# Altium PCB Pod_Islands_Panel.PcbDoc (part 10 of 10)
Units mm, origin at the board's own origin, x right, y up, seen from the top; angles counter-clockwise.
Board outline 95.7 x 83.7 mm, 6 copper layers (Top Layer, Inner1, Inner2, Inner3, Inner4, Bottom Layer), stack 0.82 mm thick; 1100 components, 940 nets, 4944 pads, 3680 vias.
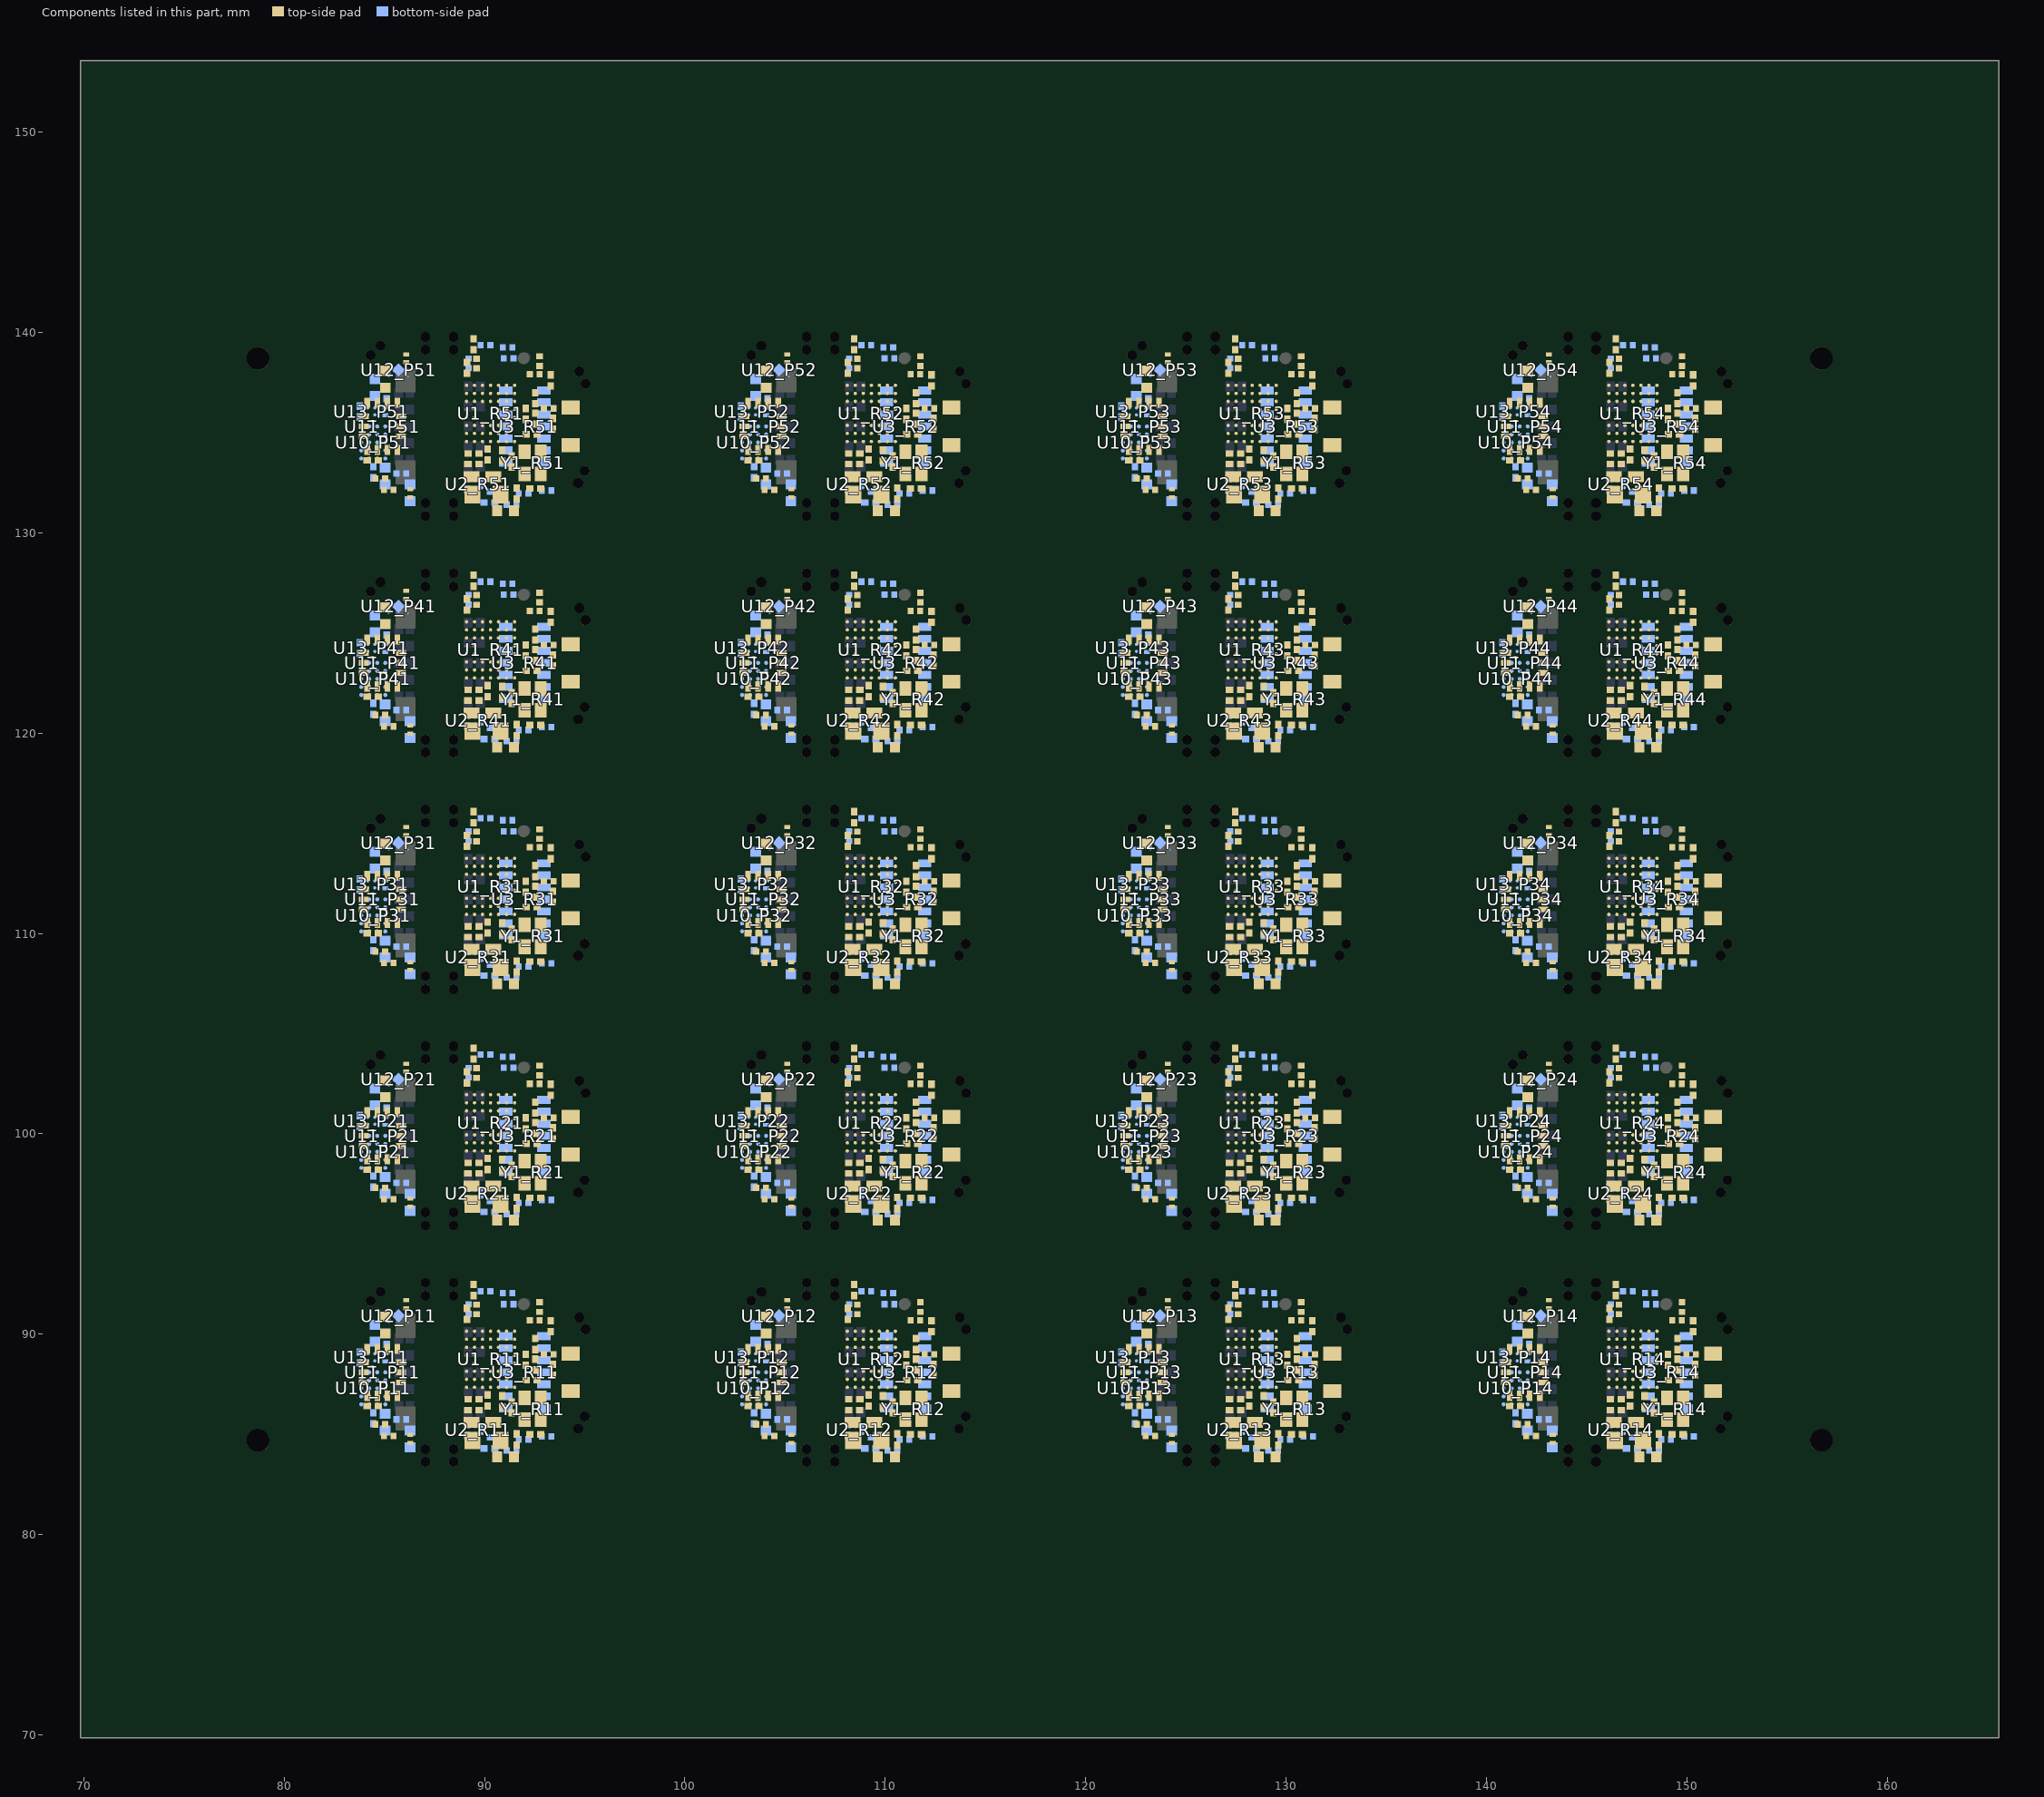
[diagram p14: the components of this part, seen from the top]

## Other copper
Top Layer:
  region: 82.2,144.7 82.196,144.635 82.183,144.571 82.162,144.509 82.133,144.45 82.097,144.396 82.054,144.346 82.004,144.303 81.95,144.267 81.891,144.238 81.829,144.217 81.765,144.204 81.7,144.2 81.635,144.204 81.571,144.217 81.509,144.238 81.45,144.267 81.396,144.303 81.346,144.346 81.303,144.396 81.267,144.45 81.238,144.509 81.217,144.571 81.204,144.635 81.2,144.7 81.204,144.765 81.217,144.829 81.238,144.891 81.267,144.95 81.303,145.004 81.346,145.054 81.396,145.097 81.45,145.133 81.509,145.162 81.571,145.183 81.635,145.196 81.7,145.2 81.765,145.196 81.829,145.183 81.891,145.162 81.95,145.133 82.004,145.097 82.054,145.054 82.097,145.004 82.133,144.95 82.162,144.891 82.183,144.829 82.196,144.765
  region: 154.2,144.7 154.196,144.635 154.183,144.571 154.162,144.509 154.133,144.45 154.097,144.396 154.054,144.346 154.004,144.303 153.95,144.267 153.891,144.238 153.829,144.217 153.765,144.204 153.7,144.2 153.635,144.204 153.571,144.217 153.509,144.238 153.45,144.267 153.396,144.303 153.346,144.346 153.303,144.396 153.267,144.45 153.238,144.509 153.217,144.571 153.204,144.635 153.2,144.7 153.204,144.765 153.217,144.829 153.238,144.891 153.267,144.95 153.303,145.004 153.346,145.054 153.396,145.097 153.45,145.133 153.509,145.162 153.571,145.183 153.635,145.196 153.7,145.2 153.765,145.196 153.829,145.183 153.891,145.162 153.95,145.133 154.004,145.097 154.054,145.054 154.097,145.004 154.133,144.95 154.162,144.891 154.183,144.829 154.196,144.765
  region: 82.2,78.7 82.196,78.635 82.183,78.571 82.162,78.509 82.133,78.45 82.097,78.396 82.054,78.346 82.004,78.303 81.95,78.267 81.891,78.238 81.829,78.217 81.765,78.204 81.7,78.2 81.635,78.204 81.571,78.217 81.509,78.238 81.45,78.267 81.396,78.303 81.346,78.346 81.303,78.396 81.267,78.45 81.238,78.509 81.217,78.571 81.204,78.635 81.2,78.7 81.204,78.765 81.217,78.829 81.238,78.891 81.267,78.95 81.303,79.004 81.346,79.054 81.396,79.097 81.45,79.133 81.509,79.162 81.571,79.183 81.635,79.196 81.7,79.2 81.765,79.196 81.829,79.183 81.891,79.162 81.95,79.133 82.004,79.097 82.054,79.054 82.097,79.004 82.133,78.95 82.162,78.891 82.183,78.829 82.196,78.765
Bottom Layer:
  region: 82.2,144.7 82.196,144.635 82.183,144.571 82.162,144.509 82.133,144.45 82.097,144.396 82.054,144.346 82.004,144.303 81.95,144.267 81.891,144.238 81.829,144.217 81.765,144.204 81.7,144.2 81.635,144.204 81.571,144.217 81.509,144.238 81.45,144.267 81.396,144.303 81.346,144.346 81.303,144.396 81.267,144.45 81.238,144.509 81.217,144.571 81.204,144.635 81.2,144.7 81.204,144.765 81.217,144.829 81.238,144.891 81.267,144.95 81.303,145.004 81.346,145.054 81.396,145.097 81.45,145.133 81.509,145.162 81.571,145.183 81.635,145.196 81.7,145.2 81.765,145.196 81.829,145.183 81.891,145.162 81.95,145.133 82.004,145.097 82.054,145.054 82.097,145.004 82.133,144.95 82.162,144.891 82.183,144.829 82.196,144.765
  region: 154.2,144.7 154.196,144.635 154.183,144.571 154.162,144.509 154.133,144.45 154.097,144.396 154.054,144.346 154.004,144.303 153.95,144.267 153.891,144.238 153.829,144.217 153.765,144.204 153.7,144.2 153.635,144.204 153.571,144.217 153.509,144.238 153.45,144.267 153.396,144.303 153.346,144.346 153.303,144.396 153.267,144.45 153.238,144.509 153.217,144.571 153.204,144.635 153.2,144.7 153.204,144.765 153.217,144.829 153.238,144.891 153.267,144.95 153.303,145.004 153.346,145.054 153.396,145.097 153.45,145.133 153.509,145.162 153.571,145.183 153.635,145.196 153.7,145.2 153.765,145.196 153.829,145.183 153.891,145.162 153.95,145.133 154.004,145.097 154.054,145.054 154.097,145.004 154.133,144.95 154.162,144.891 154.183,144.829 154.196,144.765
  region: 82.2,78.7 82.196,78.635 82.183,78.571 82.162,78.509 82.133,78.45 82.097,78.396 82.054,78.346 82.004,78.303 81.95,78.267 81.891,78.238 81.829,78.217 81.765,78.204 81.7,78.2 81.635,78.204 81.571,78.217 81.509,78.238 81.45,78.267 81.396,78.303 81.346,78.346 81.303,78.396 81.267,78.45 81.238,78.509 81.217,78.571 81.204,78.635 81.2,78.7 81.204,78.765 81.217,78.829 81.238,78.891 81.267,78.95 81.303,79.004 81.346,79.054 81.396,79.097 81.45,79.133 81.509,79.162 81.571,79.183 81.635,79.196 81.7,79.2 81.765,79.196 81.829,79.183 81.891,79.162 81.95,79.133 82.004,79.097 82.054,79.054 82.097,79.004 82.133,78.95 82.162,78.891 82.183,78.829 82.196,78.765

## Silkscreen, mask and mechanical layers (free items; w line width, h text height)
Top Solder Mask Layer:
  drawing of 123 lines, arcs and shapes, not listed
Bottom Solder Mask Layer:
  drawing of 123 lines, arcs and shapes, not listed
Document Layer:
  text "LAYOUT NOTES - RADIO ISLAND (EVT)  6L HDI 1+4+1, 0.82 mm, JLC06081H-2313, ENIG, vias filled + capped" at 96.1,93 h0.23
  text "Stack: L1 signal + RF + GND pour | L2 solid GND | L3 signal | L4 signal | L5 solid GND | L6 signal + bottom parts + GND pour" at 96.1,92.68 h0.18
  text "RF: ANT(D1) > C3 1.0pF shunt > L3 3.3nH > 50R CPWG on L1, 0.124 w / 0.127 gap, L2 ref (2313 prepreg 0.0964, sim 52.7 R) > pi C42/Z41/C40 > ANT1" at 96.1,92.36 h0.18
  text "RF: ARC bends r >= 3w, no vias in the line, no stubs; GND fence microvias (L1-L2) both sides <= 1 mm; tune the pi on a VNA" at 96.1,92.04 h0.18
  text "Antenna zone x >= 18.76 mm: no copper on L2-L6 (full regions); L1 notched only for the feed to ANT1 (ANT1 pin 1 unconnected). Via fence along its edge" at 96.1,91.72 h0.18
  text "U1: copy Nordic CIAA DC/DC reference. DEC caps at their balls; DCC>L1>L2>DEC4 loop smallest, away from RF and Y1" at 96.1,91.4 h0.18
  text "Y1 NX1612SA 1.88 mm from XC1/XC2. No vias in XC traces, GND ring, nothing switching under" at 96.1,91.08 h0.18
  text "U3 MAXM86161 (bottom): microvias L4-L3 + buried vias for PGND / GND_DIG / GND_ANA; C30 (VLED) with its own via" at 96.1,90.76 h0.18
  text "Vias: laser L1-L2 / L5-L6 0.10/0.25 filled in ball pads; buried L2-L5 0.15/0.30; stacked skip L1-L5 / L2-L6 0.10/0.25; through 0.15/0.25. No through via under U1" at 96.1,90.44 h0.18
  text "Purple bands = board clamps: no parts on either side. Copper >= 0.2 mm from the edge" at 96.1,90.12 h0.18
  text "L2-L5 GND ties around the perimeter (target <= 1.0 mm, max gap 2.4 mm < lambda/20). Placement: hardware/placement/placement_20p9.json" at 96.1,89.8 h0.18